# Altium PCB PCB_The Macarpad.pcbdoc
Units mil, origin at the board's own origin, x right, y up, seen from the top; angles counter-clockwise.
Board outline 5000 x 3735 mil, 2 copper layers (Top Layer, Bottom Layer), stack 2.757 mil thick; 8 components, 36 nets, 65 pads, 0 vias.
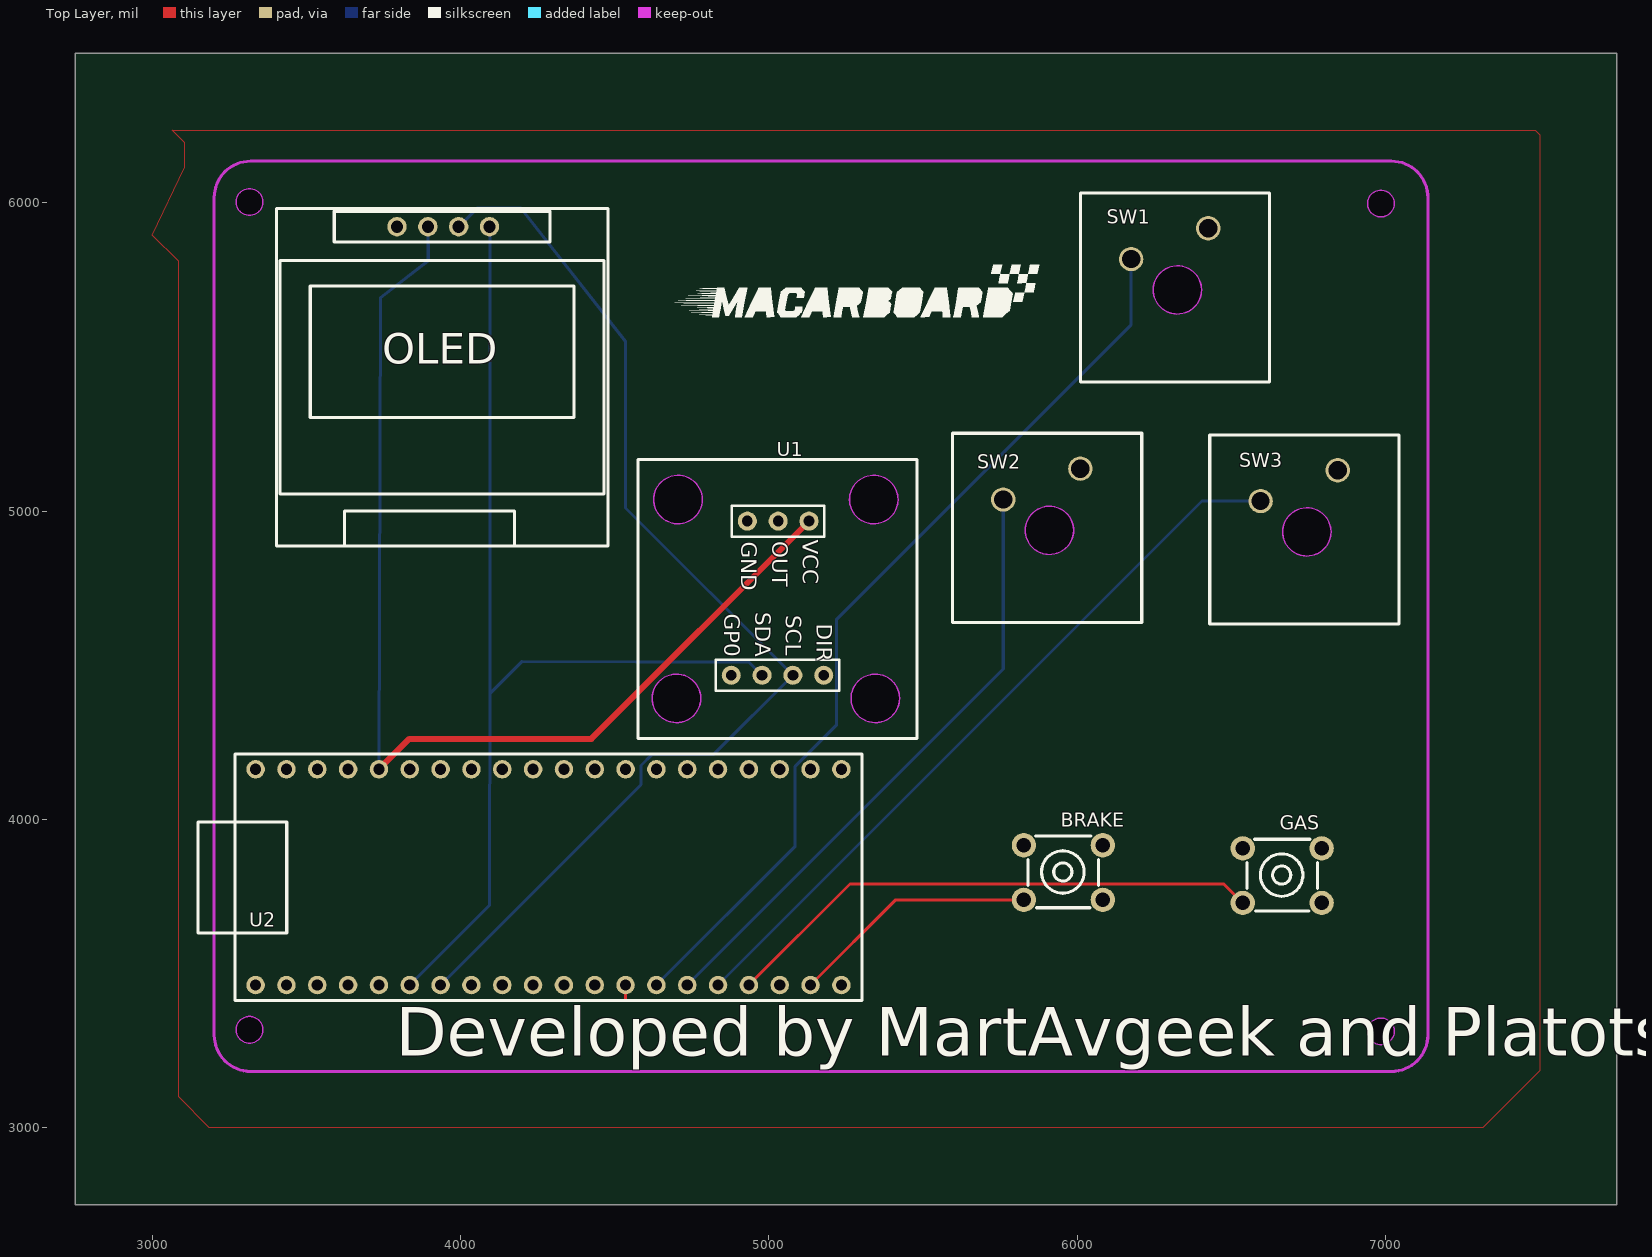
[diagram p0: Top Layer view]
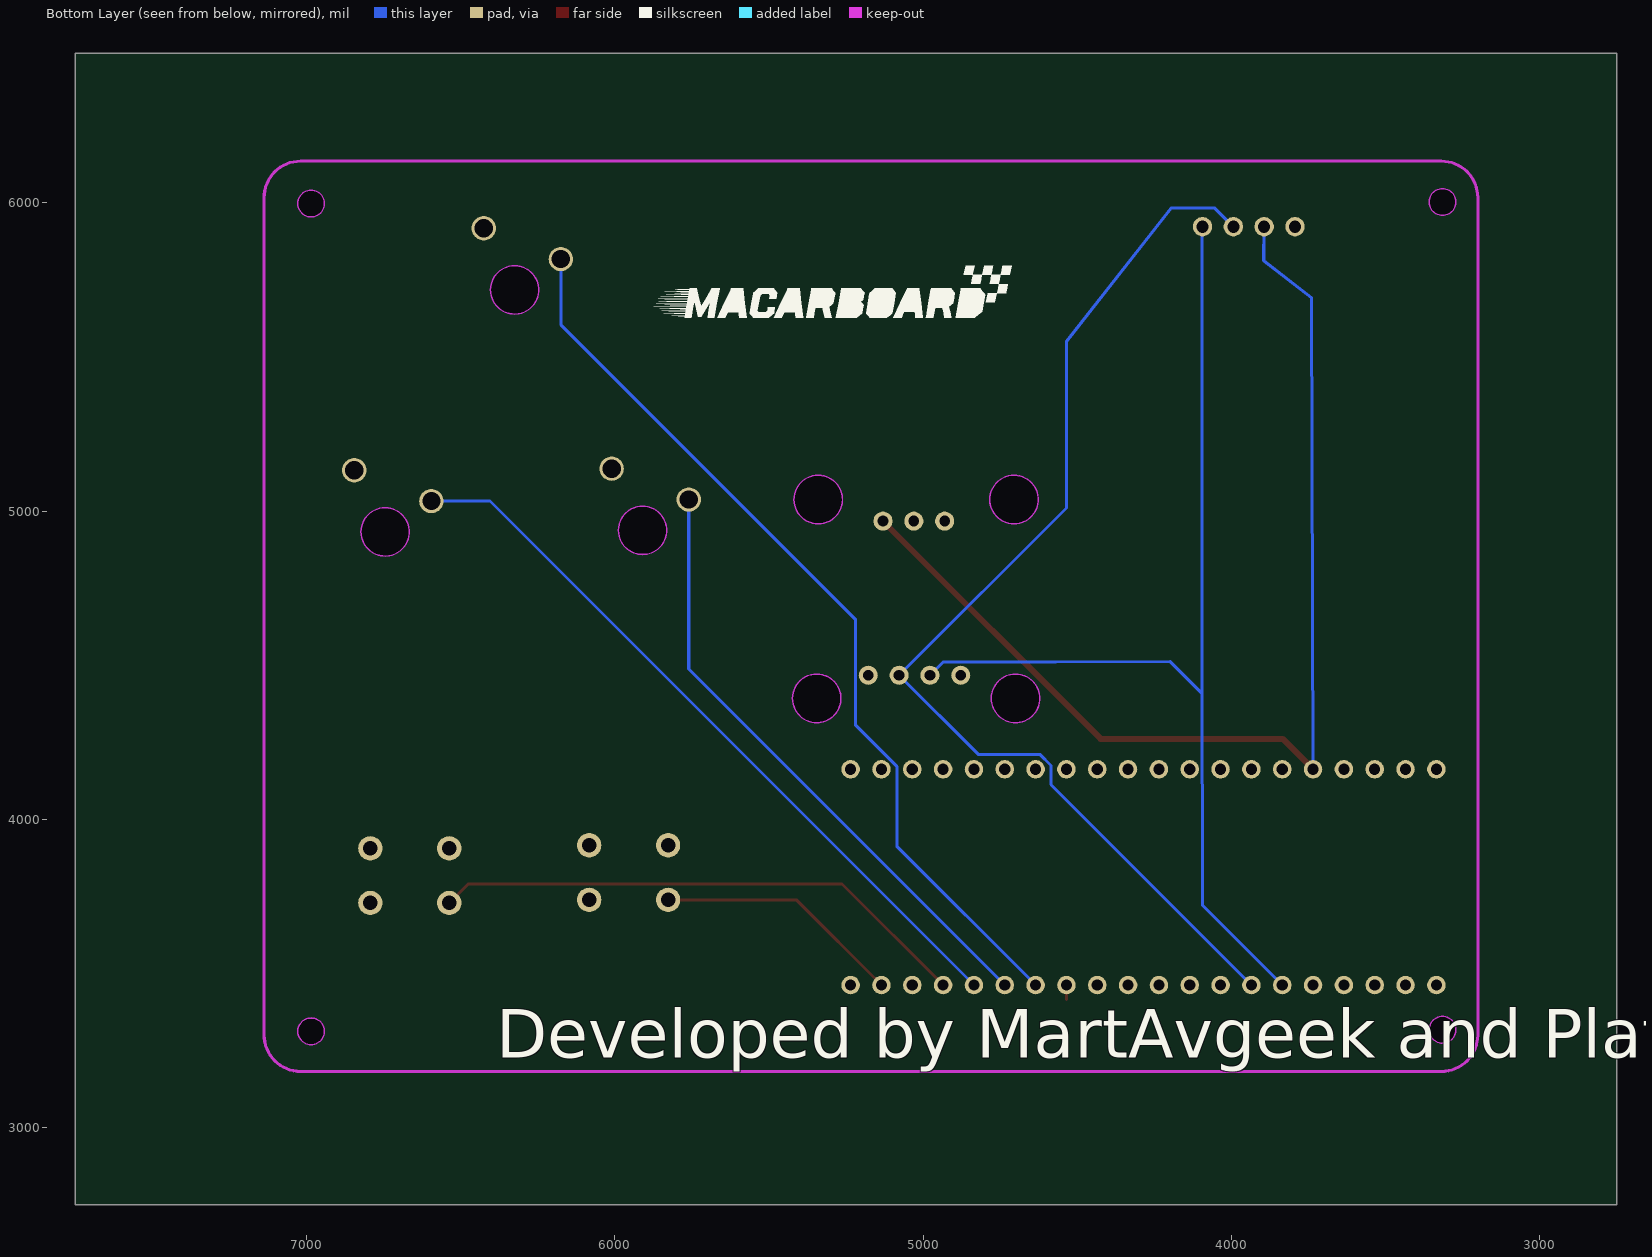
[diagram p1: Bottom Layer view, seen from below]

## Layer stack, top to bottom
Top Solder Mask Layer: solder mask 0.394, Dk 3.3
Top Layer: signal copper 1.379
Bottom Layer: signal copper 1.378
Bottom Solder Mask Layer: solder mask 0.394, Dk 3.3

## Board outline
7750,2750 2750,2750 2750,6485 7750,6485
cut-out: 7028.31,3312.5 cw(c6985,3312.5) 6941.69,3312.5 cw(c6985,3312.5)
cut-out: 7028.31,5997.5 cw(c6985,5997.5) 6941.69,5997.5 cw(c6985,5997.5)
cut-out: 3358.31,6002.5 cw(c3315,6002.5) 3271.69,6002.5 cw(c3315,6002.5)
cut-out: 3358.31,3317.5 cw(c3315,3317.5) 3271.69,3317.5 cw(c3315,3317.5)

## Design rules (kind name [scope] priority, off if disabled: settings)
BoardOutlineClearance Default [All] p0: genericclearance=10 ignorepadtopadclearanceinfootprint=FALSE except(0: Arc-SplitContinuation Track-SplitContinuation SMDPad-SplitContinuation THPad-SplitContinuation Via-SplitContinuation Fill-SplitContinuation Poly-SplitContinuation Region-SplitContinuation Text-SplitContinuation)
BoardOutlineClearance otherClearance [All] p0: genericclearance=10 ignorepadtopadclearanceinfootprint=FALSE except(0: Arc-SplitContinuation Track-SplitContinuation SMDPad-SplitContinuation THPad-SplitContinuation Via-SplitContinuation Fill-SplitContinuation Poly-SplitContinuation Region-SplitContinuation Text-SplitContinuation)
Clearance Default [All] p1: gap=7 ignorepadtopadclearanceinfootprint=FALSE
Clearance otherClearance [All] p1: gap=7 ignorepadtopadclearanceinfootprint=FALSE
DiffPairsRouting differentialPair [All] p1: maxuncoupledlength=10 minlimit=5 maxlimit=Infinity mostfreqgap=6 toplayer_minwidth=5 toplayer_prefwidth=100 toplayer_maxwidth=100 bottomlayer_minwidth=5 bottomlayer_prefwidth=100 bottomlayer_maxwidth=100
PasteMaskExpansion pasteMaskExpansion [All] p1: expansion=0
PlaneConnect innerPlane [All] p1: planeconnectstyle=Relief reliefexpansion=20 reliefentries=4 reliefconductorwidth=10 reliefairgap=10
PolygonConnect copperRegion [All] p1: connectstyle=Relief reliefentries=4 reliefconductorwidth=10 polygonreliefangle="90 Angle" airgapwidth=10
RoutingVias Default [All] p1: viastyle="Through Hole" holewidth=12 minholewidth=12 maxholewidth=1181 width=12 minwidth=12 maxwidth=1181
SolderMaskExpansion Common [IsVia] p1: useseparateexpansions=TRUE expansion=-1000 expansionbottom=-1000
SolderMaskExpansion Common [All] p2: useseparateexpansions=TRUE expansion=2 expansionbottom=2
Width Default [All] p1: maxlimit=1000 minlimit=10 preferedwidth=10

## Components (designator, comment, footprint, x,y, rotation, side; value= is the part's Value field where it differs from the comment)
BRAKE "button6*6*2Pin" KEY-TH_4P-L6.0-W6.0-P4.50 5955,3827.5 r0 top
GAS "button6*6*2Pin" KEY-TH_4P-L6.0-W6.0-P4.50 6665,3817.5 r0 top
OLED "OLED" OLED-TH_OLED0.96-I2C 3940,5922.5 r0 top
SW1 "Mechanical SW Cherry" "MECHANICAL SW" 6325,5717.5 r0 top
SW2 "Mechanical SW Cherry" "MECHANICAL SW" 5910,4937.5 r0 top
SW3 "Mechanical SW Cherry" "MECHANICAL SW" 6745,4932.5 r0 top
U1 "AS5600_PCB" AS5600 4575,5167.5 r0 top
U2 "COLOREASYPICO2-RP2350" COMM-TH_COLOREASYPICO2-RP2350 4285,3812.5 r90 top

## Footprints (in the part's own frame and the unit in brackets; to place one, negate y for a bottom-side part, rotate by r counter-clockwise, add the part's x,y. Pads: shape width x height; smd on the part's side, far side on the other; paste and mask are expansions set on the pad)
AS5600 [mil]
  round 62 hole 35 paste+0 mask+4: 1(555,-200) 2(455,-200) 3(355,-200) 4(602.76,-700) 5(502.76,-700) 6(402.76,-700) 7(302.76,-700)
  Board Outline Layer circle w0.1: c770,-775 r78.74
  Board Outline Layer circle w0.1: c765,-130 r78.74
  Board Outline Layer circle w0.1: c125,-775 r78.74
  Board Outline Layer circle w0.1: c130,-130 r78.74
  Board Outline Layer region: 848.74,-775 840.94,-809.16 819.09,-836.56 787.52,-851.77 752.48,-851.77 720.91,-836.56 699.06,-809.16 691.26,-775 691.26,-775 699.06,-740.84 720.91,-713.44 752.48,-698.23 787.52,-698.23 819.09,-713.44 840.94,-740.84 848.74,-775
  Board Outline Layer region: 848.74,-775 848.36,-782.72 847.23,-790.36 845.35,-797.86 842.75,-805.13 839.44,-812.12 835.47,-818.75 830.87,-824.95 825.68,-830.68 819.95,-835.87 813.75,-840.47 807.12,-844.44 800.13,-847.75 792.86,-850.35 785.36,-852.23 777.72,-853.36 770,-853.74 762.28,-853.36 754.64,-852.23 747.14,-850.35 739.87,-847.75 732.88,-844.44 726.25,-840.47 720.05,-835.87 714.32,-830.68 709.13,-824.95 704.53,-818.75 700.56,-812.12 697.25,-805.13 694.65,-797.86 692.77,-790.36 691.64,-782.72 691.26,-775 691.64,-767.28 692.77,-759.64 694.65,-752.14 697.25,-744.87 700.56,-737.88 704.53,-731.25 709.13,-725.05 714.32,-719.32 720.05,-714.13 726.25,-709.53 732.88,-705.56 739.87,-702.25 747.14,-699.65 754.64,-697.77 762.28,-696.64 770,-696.26 777.72,-696.64 785.36,-697.77 792.86,-699.65 800.13,-702.25 807.12,-705.56 813.75,-709.53 819.95,-714.13 825.68,-719.32 830.87,-725.05 835.47,-731.25 839.44,-737.88 842.75,-744.87 845.35,-752.14 847.23,-759.64 848.36,-767.28
  Board Outline Layer region: 843.74,-130 835.94,-164.16 814.09,-191.56 782.52,-206.77 747.48,-206.77 715.91,-191.56 694.06,-164.16 686.26,-130 686.26,-130 694.06,-95.84 715.91,-68.44 747.48,-53.23 782.52,-53.23 814.09,-68.44 835.94,-95.84 843.74,-130
  Board Outline Layer region: 843.74,-130 843.36,-137.72 842.23,-145.36 840.35,-152.86 837.75,-160.13 834.44,-167.12 830.47,-173.75 825.87,-179.95 820.68,-185.68 814.95,-190.87 808.75,-195.47 802.12,-199.44 795.13,-202.75 787.86,-205.35 780.36,-207.23 772.72,-208.36 765,-208.74 757.28,-208.36 749.64,-207.23 742.14,-205.35 734.87,-202.75 727.88,-199.44 721.25,-195.47 715.05,-190.87 709.32,-185.68 704.13,-179.95 699.53,-173.75 695.56,-167.12 692.25,-160.13 689.65,-152.86 687.77,-145.36 686.64,-137.72 686.26,-130 686.64,-122.28 687.77,-114.64 689.65,-107.14 692.25,-99.87 695.56,-92.88 699.53,-86.25 704.13,-80.05 709.32,-74.32 715.05,-69.13 721.25,-64.53 727.88,-60.56 734.87,-57.25 742.14,-54.65 749.64,-52.77 757.28,-51.64 765,-51.26 772.72,-51.64 780.36,-52.77 787.86,-54.65 795.13,-57.25 802.12,-60.56 808.75,-64.53 814.95,-69.13 820.68,-74.32 825.87,-80.05 830.47,-86.25 834.44,-92.88 837.75,-99.87 840.35,-107.14 842.23,-114.64 843.36,-122.28
  Board Outline Layer region: 203.74,-775 195.94,-809.16 174.09,-836.56 142.52,-851.77 107.48,-851.77 75.91,-836.56 54.06,-809.16 46.26,-775 46.26,-775 54.06,-740.84 75.91,-713.44 107.48,-698.23 142.52,-698.23 174.09,-713.44 195.94,-740.84 203.74,-775
  Board Outline Layer region: 203.74,-775 203.36,-782.72 202.23,-790.36 200.35,-797.86 197.75,-805.13 194.44,-812.12 190.47,-818.75 185.87,-824.95 180.68,-830.68 174.95,-835.87 168.75,-840.47 162.12,-844.44 155.13,-847.75 147.86,-850.35 140.36,-852.23 132.72,-853.36 125,-853.74 117.28,-853.36 109.64,-852.23 102.14,-850.35 94.87,-847.75 87.88,-844.44 81.25,-840.47 75.05,-835.87 69.32,-830.68 64.13,-824.95 59.53,-818.75 55.56,-812.12 52.25,-805.13 49.65,-797.86 47.77,-790.36 46.64,-782.72 46.26,-775 46.64,-767.28 47.77,-759.64 49.65,-752.14 52.25,-744.87 55.56,-737.88 59.53,-731.25 64.13,-725.05 69.32,-719.32 75.05,-714.13 81.25,-709.53 87.88,-705.56 94.87,-702.25 102.14,-699.65 109.64,-697.77 117.28,-696.64 125,-696.26 132.72,-696.64 140.36,-697.77 147.86,-699.65 155.13,-702.25 162.12,-705.56 168.75,-709.53 174.95,-714.13 180.68,-719.32 185.87,-725.05 190.47,-731.25 194.44,-737.88 197.75,-744.87 200.35,-752.14 202.23,-759.64 203.36,-767.28
  Board Outline Layer region: 208.74,-130 200.94,-164.16 179.09,-191.56 147.52,-206.77 112.48,-206.77 80.91,-191.56 59.06,-164.16 51.26,-130 51.26,-130 59.06,-95.84 80.91,-68.44 112.48,-53.23 147.52,-53.23 179.09,-68.44 200.94,-95.84 208.74,-130
  Board Outline Layer region: 208.74,-130 208.36,-137.72 207.23,-145.36 205.35,-152.86 202.75,-160.13 199.44,-167.12 195.47,-173.75 190.87,-179.95 185.68,-185.68 179.95,-190.87 173.75,-195.47 167.12,-199.44 160.13,-202.75 152.86,-205.35 145.36,-207.23 137.72,-208.36 130,-208.74 122.28,-208.36 114.64,-207.23 107.14,-205.35 99.87,-202.75 92.88,-199.44 86.25,-195.47 80.05,-190.87 74.32,-185.68 69.13,-179.95 64.53,-173.75 60.56,-167.12 57.25,-160.13 54.65,-152.86 52.77,-145.36 51.64,-137.72 51.26,-130 51.64,-122.28 52.77,-114.64 54.65,-107.14 57.25,-99.87 60.56,-92.88 64.53,-86.25 69.13,-80.05 74.32,-74.32 80.05,-69.13 86.25,-64.53 92.88,-60.56 99.87,-57.25 107.14,-54.65 114.64,-52.77 122.28,-51.64 130,-51.26 137.72,-51.64 145.36,-52.77 152.86,-54.65 160.13,-57.25 167.12,-60.56 173.75,-64.53 179.95,-69.13 185.68,-74.32 190.87,-80.05 195.47,-86.25 199.44,-92.88 202.75,-99.87 205.35,-107.14 207.23,-114.64 208.36,-122.28
  Multi-Layer board cut-out: 848.74,-775 840.94,-809.16 819.09,-836.56 787.52,-851.77 752.48,-851.77 720.91,-836.56 699.06,-809.16 691.26,-775 691.26,-775 699.06,-740.84 720.91,-713.44 752.48,-698.23 787.52,-698.23 819.09,-713.44 840.94,-740.84 848.74,-775
  Multi-Layer board cut-out: 843.74,-130 835.94,-164.16 814.09,-191.56 782.52,-206.77 747.48,-206.77 715.91,-191.56 694.06,-164.16 686.26,-130 686.26,-130 694.06,-95.84 715.91,-68.44 747.48,-53.23 782.52,-53.23 814.09,-68.44 835.94,-95.84 843.74,-130
  Multi-Layer board cut-out: 203.74,-775 195.94,-809.16 174.09,-836.56 142.52,-851.77 107.48,-851.77 75.91,-836.56 54.06,-809.16 46.26,-775 46.26,-775 54.06,-740.84 75.91,-713.44 107.48,-698.23 142.52,-698.23 174.09,-713.44 195.94,-740.84 203.74,-775
  Multi-Layer board cut-out: 208.74,-130 200.94,-164.16 179.09,-191.56 147.52,-206.77 112.48,-206.77 80.91,-191.56 59.06,-164.16 51.26,-130 51.26,-130 59.06,-95.84 80.91,-68.44 112.48,-53.23 147.52,-53.23 179.09,-68.44 200.94,-95.84 208.74,-130
  silkscreen extent 0,-906 906,0
COMM-TH_COLOREASYPICO2-RP2350 [mil]
  round 60 hole 36 paste+0 mask+1.97: 1(-349.95,950.05) 2(-349.95,850.05) 3(-349.95,750.05) 4(-349.95,650.05) 5(-349.95,550.05) 6(-349.95,450.05) 7(-349.95,350.05) 8(-349.95,250.05) 9(-349.95,150.05) 10(-349.95,50.05) 11(-349.95,-49.95) 12(-349.95,-149.95) 13(-349.95,-249.95) 14(-349.95,-349.95) 15(-349.95,-449.95) 16(-349.95,-549.95) 17(-349.95,-649.95) 18(-349.95,-749.95) 19(-349.95,-849.95) 20(-349.95,-949.95) 21(349.95,-950.05) 22(349.95,-850.05) 23(349.95,-750.05) 24(349.95,-650.05) 25(349.95,-550.05) 26(349.95,-450.05) 27(349.95,-350.05) 28(349.95,-250.05) 29(349.95,-150.05) 30(349.95,-50.05) 31(349.95,49.95) 32(349.95,149.95) 33(349.95,249.95) 34(349.95,349.95) 35(349.95,449.95) 36(349.95,549.95) 37(349.95,649.95) 38(349.95,749.95) 39(349.95,849.95) 40(349.95,949.95)
  silkscreen extent -400,-1017 400,1137
KEY-TH_4P-L6.0-W6.0-P4.50 [mm]
  round 2 hole 1.2 paste+0 mask+0.051: 1(-3.25,-2.25) 2(3.25,-2.25) 3(3.25,2.25) 4(-3.25,2.25)
  silkscreen extent -2.9,-2.9 2.9,3
"MECHANICAL SW" [mm]
  round 2 hole 1.5 paste+0 mask+0.051: 1(-3.81,2.54) 2(2.54,5.08)
  Board Outline Layer circle w0.003: c0,0 r1.99
  Board Outline Layer region: 1.99,0 1.793,-0.863 1.241,-1.556 0.443,-1.94 -0.443,-1.94 -1.241,-1.556 -1.793,-0.863 -1.99,0 -1.99,0 -1.793,0.863 -1.241,1.556 -0.443,1.94 0.443,1.94 1.241,1.556 1.793,0.863 1.99,0
  Board Outline Layer region: 1.99,0 1.98,-0.195 1.952,-0.388 1.904,-0.578 1.839,-0.762 1.755,-0.938 1.655,-1.106 1.538,-1.262 1.407,-1.407 1.262,-1.538 1.106,-1.655 0.938,-1.755 0.762,-1.839 0.578,-1.904 0.388,-1.952 0.195,-1.98 0,-1.99 -0.195,-1.98 -0.388,-1.952 -0.578,-1.904 -0.762,-1.839 -0.938,-1.755 -1.106,-1.655 -1.262,-1.538 -1.407,-1.407 -1.538,-1.262 -1.655,-1.106 -1.755,-0.938 -1.839,-0.762 -1.904,-0.578 -1.952,-0.388 -1.98,-0.195 -1.99,0 -1.98,0.195 -1.952,0.388 -1.904,0.578 -1.839,0.762 -1.755,0.938 -1.655,1.106 -1.538,1.262 -1.407,1.407 -1.262,1.538 -1.106,1.655 -0.938,1.755 -0.762,1.839 -0.578,1.904 -0.388,1.952 -0.195,1.98 0,1.99 0.195,1.98 0.388,1.952 0.578,1.904 0.762,1.839 0.938,1.755 1.106,1.655 1.262,1.538 1.407,1.407 1.538,1.262 1.655,1.106 1.755,0.938 1.839,0.762 1.904,0.578 1.952,0.388 1.98,0.195
  Multi-Layer board cut-out: 1.99,0 1.793,-0.863 1.241,-1.556 0.443,-1.94 -0.443,-1.94 -1.241,-1.556 -1.793,-0.863 -1.99,0 -1.99,0 -1.793,0.863 -1.241,1.556 -0.443,1.94 0.443,1.94 1.241,1.556 1.793,0.863 1.99,0
  silkscreen extent -8,-7.6 7.6,8
OLED-TH_OLED0.96-I2C [mm]
  round 1.6 hole 1 paste+0 mask+0.05: 3(-3.72,0) 4(-1.18,0) 5(1.36,0) 6(3.9,0)
  silkscreen extent -13.65,-26.3 13.65,1.5

## Nets (pads, with @x,y where several pads share a name; then routed paths per layer and width w, separated by ;. In a path a pad name is that pad's centre, name@x,y a point inside that pad or via, vN(x,y) a via of type N, cw(c..) or ccw(c..) an arc to the next point about the centre after c; other vN are vias at no path point)
BRAKE: BRAKE.1 U2.19 | length 806.6
  Top Layer w10: U2.19 5411.32,3738.92 BRAKE.1@5827.05,3738.92
BTN1: SW1.1 U2.14 | length 2992.9
  Bottom Layer w10: U2.14 5085.05,3912.65 5085.05,4172.01 5219.82,4306.78 5219.82,4649.42 6175,5604.6 SW1.1
BTN2: SW2.1 U2.15 | length 1999.5
  Bottom Layer w10: U2.15 5760,4487.6 SW2.1
BTN3: SW3.1 U2.16 | length 2410.3
  Bottom Layer w10: U2.16 6404.9,5032.5 SW3.1
DIR: U1.4
GAS: GAS.1 U2.17 | length 1763.5
  Top Layer w10: U2.17 5262.93,3790.53 6475.44,3790.53 GAS.1@6537.05,3728.92
GND: BRAKE.3 GAS.3 OLED.3 SW1.2 SW2.2 SW3.2 U1.3 U2.3 U2.8 U2.13 U2.18 U2.23 U2.28 U2.33 U2.38 | length 53.7
  Top Layer w10: 4534.95,3416.11 U2.13
  Top Layer w39.37: SW2.2 SW2.2@6015,5132.5
  Bottom Layer w10: U2.3 U2.3@3535.05,3462.65
GPO: U1.7
OUT: U1.2
SCL: OLED.5 U1.5 U2.7 | length 3679.3
  Bottom Layer w10: U2.7@3935,3462.5 4585,4112.6 4585,4174.8 4621.3,4211.1 4821.4,4211.1 U1.5 4535,5010.3 4535,5549.4 4195,5982.5 4053.5,5982.5 OLED.5
SDA: OLED.6 U1.6 U2.6 | length 3508.7
  Bottom Layer w10: U2.6 4093.54,3721.14 4095,4507.5 ; 4094.8,4407.7 4199.6,4512.5 4935.6,4509.7 U1.6 ; 4095,4509.71 OLED.6@4095,5922.5
U2_1: U2.1
U2_2: U2.2
U2_4: U2.4
U2_5: U2.5
U2_9: U2.9
U2_10: U2.10
U2_11: U2.11
U2_12: U2.12
U2_20: U2.20
U2_21: U2.21
U2_22: U2.22
U2_24: U2.24
U2_25: U2.25
U2_26: U2.26
U2_27: U2.27
U2_29: U2.29
U2_30: U2.30
U2_31: U2.31
U2_32: U2.32
U2_34: U2.34
U2_35: U2.35
U2_37: U2.37
U2_39: U2.39
U2_40: U2.40
VCC: OLED.4 U1.1 U2.36 | length 3564.5
  Top Layer w19.68: U2.36@3735.05,4162.45 3833.83,4261.23 4423.73,4261.23 U1.1
  Bottom Layer w10: U2.36@3735.05,4162.45 3740,5692.5 3895,5812.5 OLED.4
pads on no net: BRAKE.2 BRAKE.4 GAS.2 GAS.4

## Polygon pours and split planes (outlines as drawn)
GND on Top Layer (solid, remove dead copper, pour order 2): 3105,6115 3105,6195 3065,6235 7485,6235 7500,6220 7500,3185 7315,3000 3185,3000 3085,3100 3085,5810 3000,5895

## Keep-outs
Board Outline Layer:
  region: 7028.31,3312.5 cw(c6985,3312.5) 6941.69,3312.5 cw(c6985,3312.5)
  circle w0.1: c6985,3312.5 r43.31
  region: 7028.31,3312.5 7027.94,3306.85 7026.83,3301.29 7025.01,3295.93 7022.51,3290.85 7019.36,3286.14 7015.62,3281.88 7011.36,3278.14 7006.65,3274.99 7001.57,3272.49 6996.21,3270.67 6990.65,3269.56 6985,3269.19 6979.35,3269.56 6973.79,3270.67 6968.43,3272.49 6963.35,3274.99 6958.64,3278.14 6954.38,3281.88 6950.64,3286.14 6947.49,3290.85 6944.99,3295.93 6943.17,3301.29 6942.06,3306.85 6941.69,3312.5 6942.06,3318.15 6943.17,3323.71 6944.99,3329.07 6947.49,3334.15 6950.64,3338.86 6954.38,3343.12 6958.64,3346.86 6963.35,3350.01 6968.43,3352.51 6973.79,3354.33 6979.35,3355.44 6985,3355.81 6990.65,3355.44 6996.21,3354.33 7001.57,3352.51 7006.65,3350.01 7011.36,3346.86 7015.62,3343.12 7019.36,3338.86 7022.51,3334.15 7025.01,3329.07 7026.83,3323.71 7027.94,3318.15
  region: 7028.31,5997.5 cw(c6985,5997.5) 6941.69,5997.5 cw(c6985,5997.5)
  circle w0.1: c6985,5997.5 r43.31
  region: 7028.31,5997.5 7027.94,5991.85 7026.83,5986.29 7025.01,5980.93 7022.51,5975.85 7019.36,5971.14 7015.62,5966.88 7011.36,5963.14 7006.65,5959.99 7001.57,5957.49 6996.21,5955.67 6990.65,5954.56 6985,5954.19 6979.35,5954.56 6973.79,5955.67 6968.43,5957.49 6963.35,5959.99 6958.64,5963.14 6954.38,5966.88 6950.64,5971.14 6947.49,5975.85 6944.99,5980.93 6943.17,5986.29 6942.06,5991.85 6941.69,5997.5 6942.06,6003.15 6943.17,6008.71 6944.99,6014.07 6947.49,6019.15 6950.64,6023.86 6954.38,6028.12 6958.64,6031.86 6963.35,6035.01 6968.43,6037.51 6973.79,6039.33 6979.35,6040.44 6985,6040.81 6990.65,6040.44 6996.21,6039.33 7001.57,6037.51 7006.65,6035.01 7011.36,6031.86 7015.62,6028.12 7019.36,6023.86 7022.51,6019.15 7025.01,6014.07 7026.83,6008.71 7027.94,6003.15
  region: 3358.31,6002.5 cw(c3315,6002.5) 3271.69,6002.5 cw(c3315,6002.5)
  circle w0.1: c3315,6002.5 r43.31
  region: 3358.31,6002.5 3357.94,5996.85 3356.83,5991.29 3355.01,5985.93 3352.51,5980.85 3349.36,5976.14 3345.62,5971.88 3341.36,5968.14 3336.65,5964.99 3331.57,5962.49 3326.21,5960.67 3320.65,5959.56 3315,5959.19 3309.35,5959.56 3303.79,5960.67 3298.43,5962.49 3293.35,5964.99 3288.64,5968.14 3284.38,5971.88 3280.64,5976.14 3277.49,5980.85 3274.99,5985.93 3273.17,5991.29 3272.06,5996.85 3271.69,6002.5 3272.06,6008.15 3273.17,6013.71 3274.99,6019.07 3277.49,6024.15 3280.64,6028.86 3284.38,6033.12 3288.64,6036.86 3293.35,6040.01 3298.43,6042.51 3303.79,6044.33 3309.35,6045.44 3315,6045.81 3320.65,6045.44 3326.21,6044.33 3331.57,6042.51 3336.65,6040.01 3341.36,6036.86 3345.62,6033.12 3349.36,6028.86 3352.51,6024.15 3355.01,6019.07 3356.83,6013.71 3357.94,6008.15
  region: 3358.31,3317.5 cw(c3315,3317.5) 3271.69,3317.5 cw(c3315,3317.5)
  circle w0.1: c3315,3317.5 r43.31
  region: 3358.31,3317.5 3357.94,3311.85 3356.83,3306.29 3355.01,3300.93 3352.51,3295.85 3349.36,3291.14 3345.62,3286.88 3341.36,3283.14 3336.65,3279.99 3331.57,3277.49 3326.21,3275.67 3320.65,3274.56 3315,3274.19 3309.35,3274.56 3303.79,3275.67 3298.43,3277.49 3293.35,3279.99 3288.64,3283.14 3284.38,3286.88 3280.64,3291.14 3277.49,3295.85 3274.99,3300.93 3273.17,3306.29 3272.06,3311.85 3271.69,3317.5 3272.06,3323.15 3273.17,3328.71 3274.99,3334.07 3277.49,3339.15 3280.64,3343.86 3284.38,3348.12 3288.64,3351.86 3293.35,3355.01 3298.43,3357.51 3303.79,3359.33 3309.35,3360.44 3315,3360.81 3320.65,3360.44 3326.21,3359.33 3331.57,3357.51 3336.65,3355.01 3341.36,3351.86 3345.62,3348.12 3349.36,3343.86 3352.51,3339.15 3355.01,3334.07 3356.83,3328.71 3357.94,3323.15
  lines w10: 3200.59,3300.57 3200.59,6017.1 cw(c3318.7,6017.1) 3318.7,6135.21 7019.48,6135.21 cw(c7019.48,6017.1) 7137.59,6017.1 7137.59,3300.57 cw(c7019.48,3300.57) 7019.48,3182.46 3318.7,3182.46 cw(c3318.7,3300.57) 3200.59,3300.57

## Silkscreen, mask and mechanical layers (free items; w line width, h text height)
Top Silkscreen Layer:
  drawing of 17 lines, arcs and shapes, not listed
  text "Developed by MartAvgeek and Platots" at 3790,3232.5 h157.48
Bottom Silkscreen Layer:
  drawing of 17 lines, arcs and shapes, not listed
  text "Developed by MartAvgeek and Platots" at 6385,3227.5 h157.48
Mechanical Layer:
  circle w0.1: c6985,3312.5 r43.31
  circle w0.1: c6985,5997.5 r43.31
  circle w0.1: c3315,6002.5 r43.31
  circle w0.1: c3315,3317.5 r43.31

## Text inside footprints (layer, text, board x,y; h text height)
U1: Top Silkscreen Layer "GND" at 4910,4900.1 h51.18 r270; Top Silkscreen Layer "OUT" at 5010,4902.5 h51.18 r270; Top Silkscreen Layer "VCC" at 5110,4907.1 h51.18 r270; Top Silkscreen Layer "GP0" at 4855,4667.5 h51.18 r270; Top Silkscreen Layer "SDA" at 4955,4672.5 h51.18 r270; Top Silkscreen Layer "SCL" at 5055,4662.5 h51.18 r270; Top Silkscreen Layer "DIR" at 5155,4635.2 h51.18 r270